# Altium PCB SiPAP_PCB.PcbDoc
Units mil, origin at the board's own origin, x right, y up, seen from the top; angles counter-clockwise.
Board outline 4000 x 3000 mil, 2 copper layers (Top Layer, Bottom Layer); 78 components, 40 nets, 273 pads, 139 vias.
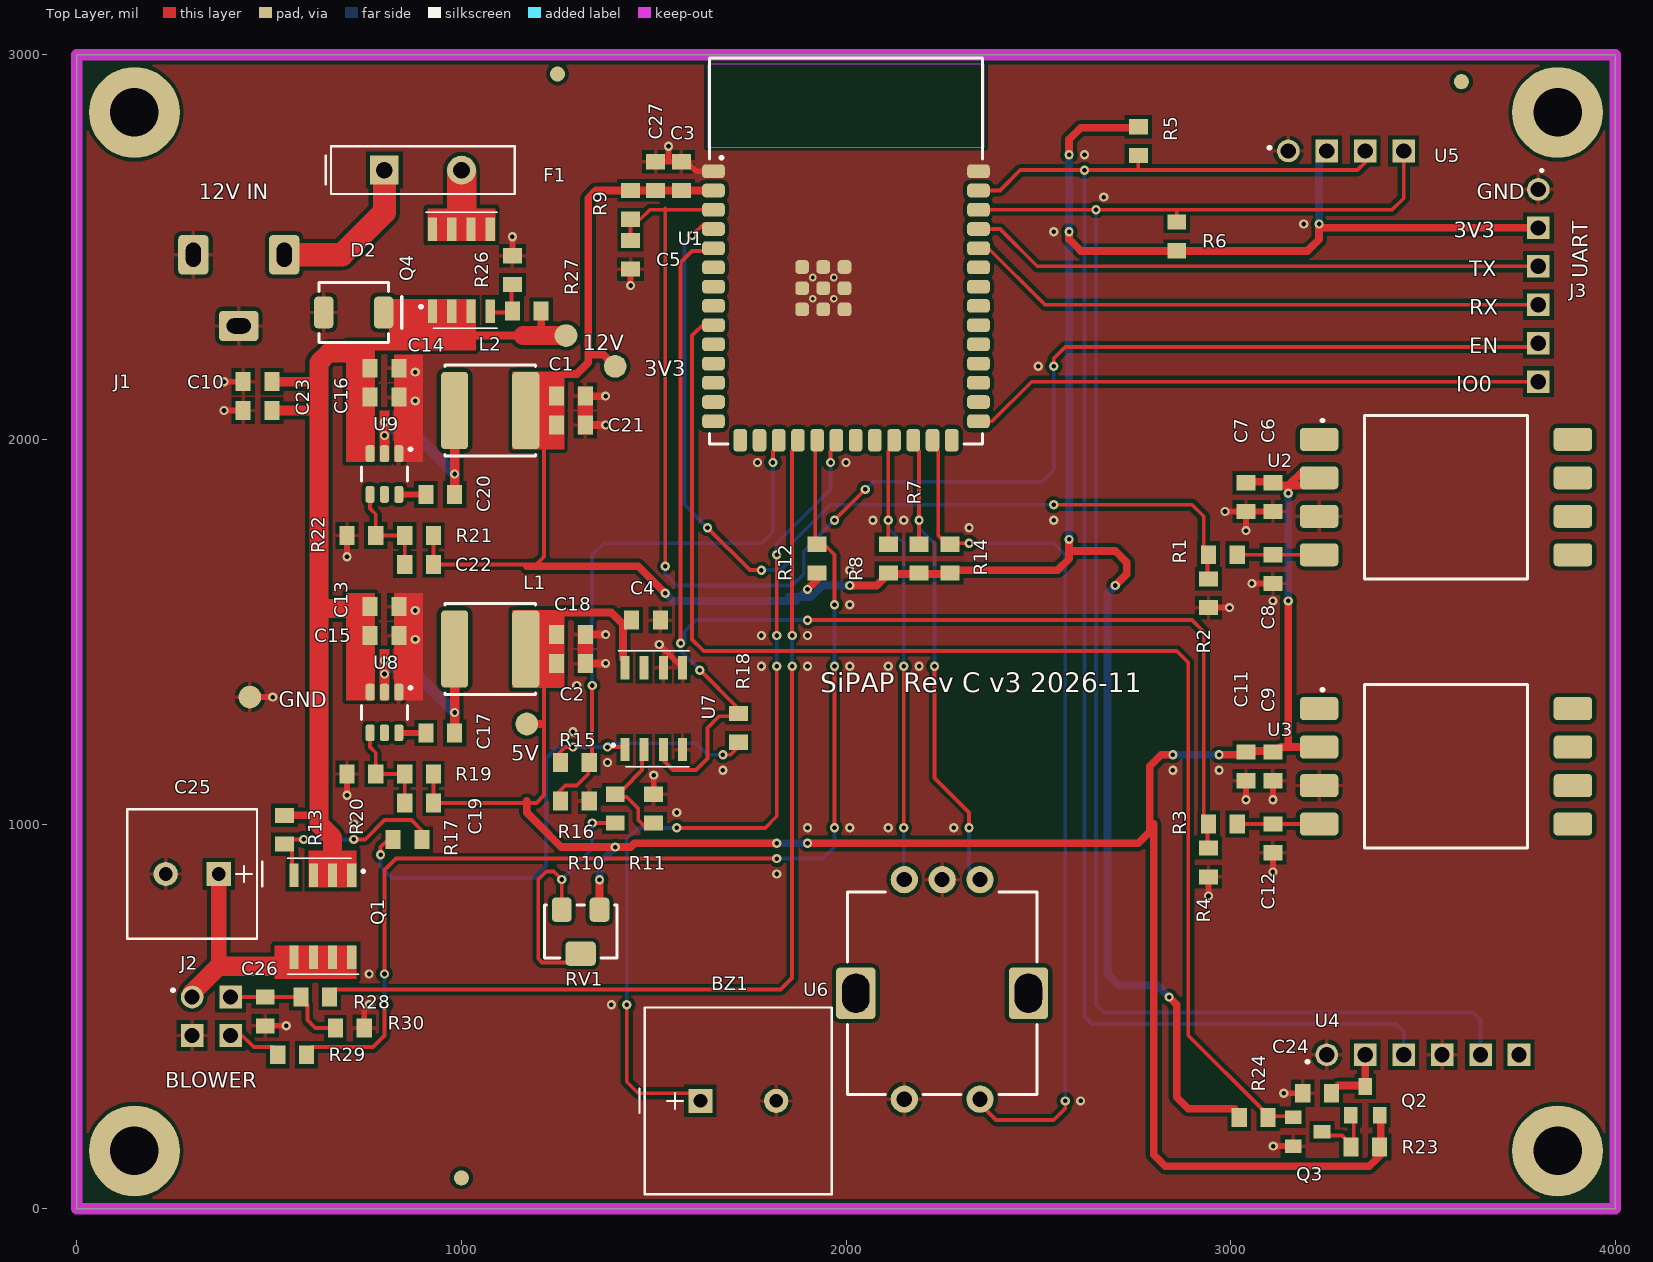
[diagram p0: Top Layer view]
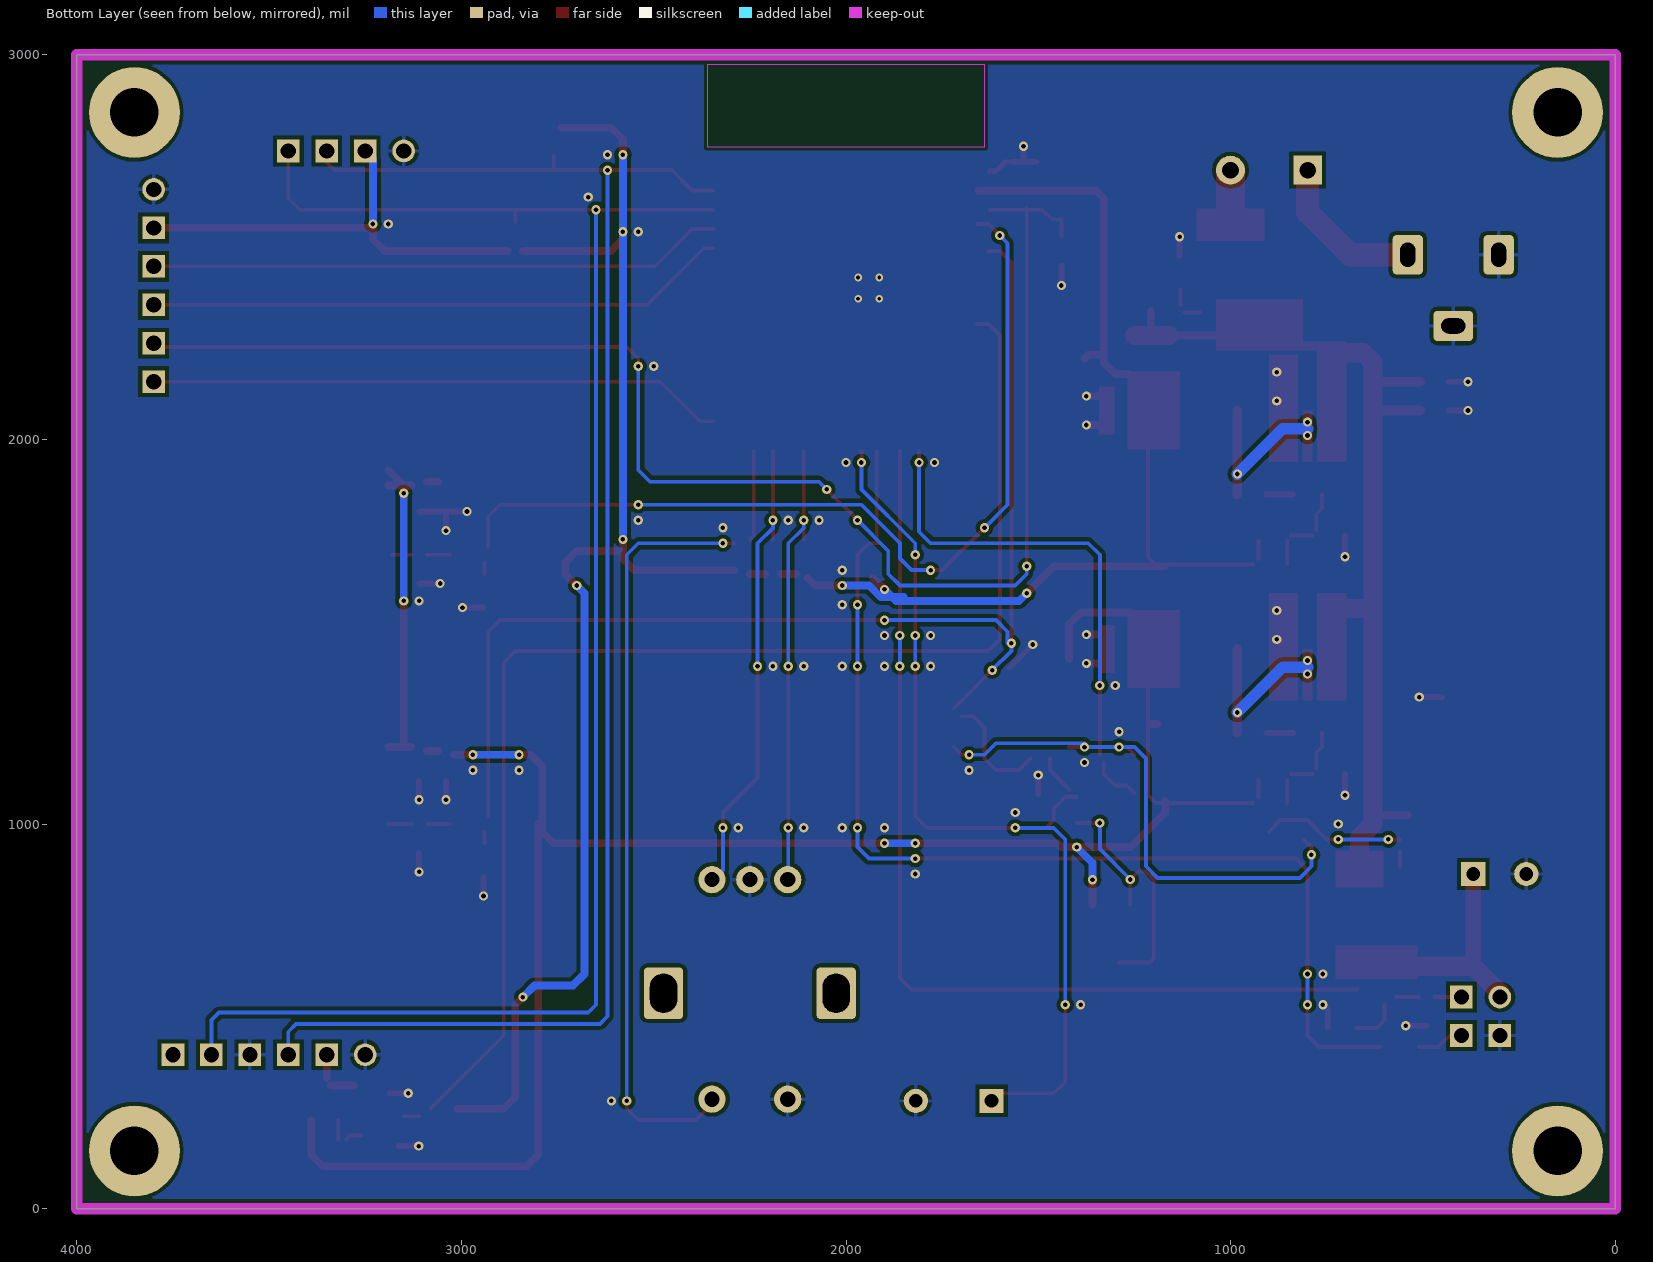
[diagram p1: Bottom Layer view, seen from below]

## Layer stack, top to bottom
Top Solder: solder mask 0.4, Solder Resist, Dk 3.5
Top Layer: signal copper 1.4
Dielectric 1: dielectric 12.6, FR-4, Dk 4.8
Bottom Layer: signal copper 1.4
Bottom Solder: solder mask 0.4, Solder Resist, Dk 3.5

## Board outline
0,0 4000,0 4000,3000 0,3000

## Design rules (kind name [scope] priority, off if disabled: settings)
Clearance [All] p1: gap=10 ignorepadtopadclearanceinfootprint=FALSE
Height [All] p1: minheight=0 maxheight=1250 prefheight=500
HoleSize [All] p1: absolutevalues=TRUE maxlimit=150 minlimit=1 maxpercent=80.000 minpercent=20.000
MinimumSolderMaskSliver [All] p1: minsoldermaskwidth=4 // JLCPCB soldermask bridge 0.10 mm (1 oz, green)
PolygonConnect PolyConnect_U1_EPAD_Direct [InComponent('U1')] p1: connectstyle=Direct reliefconductorwidth=10 reliefentries=4 polygonreliefangle="90 Angle" airgapwidth=10
PolygonConnect PolyConnect_Vias_Direct [IsVia] p2: connectstyle=Direct reliefconductorwidth=10 reliefentries=4 polygonreliefangle="90 Angle" airgapwidth=10
PolygonConnect [All] p3: connectstyle=Relief reliefconductorwidth=10 reliefentries=4 polygonreliefangle="90 Angle" airgapwidth=10
RoutingCorners [All] p1: cornerstyle=45-Degree minsetback=10 maxsetback=100
RoutingVias [All] p1: holewidth=12 width=24 viastyle="Through Hole" minholewidth=10 minwidth=20 maxholewidth=16 maxwidth=32
SilkToSilkClearance [All] p1: silktosilkclearance=6 // JLCPCB silk spacing 0.15 mm
SilkToSolderMaskClearance [IsPad] p1: minsilkscreentomaskgap=6 clearancetoexposedcopper=TRUE // JLCPCB: silkscreen to pad >= 0.15 mm
SolderMaskExpansion TentedVias [IsVia] p1: expansion=-30 istentingtop=FALSE
SolderMaskExpansion [All] p2: expansion=0 istentingtop=FALSE
SupplyNets "Schematic Supply Nets_3" [InNet('3V3')] p1: voltage=0.000
SupplyNets "Schematic Supply Nets_2" [InNet('GND')] p2: voltage=0.000
SupplyNets "Schematic Supply Nets_1" [InNet('VIN12V')] p3: voltage=0.000
SupplyNets "Schematic Supply Nets" [InNet('5V')] p4: voltage=0.000
ViasUnderSMD NoViaInPad [All] p1: allowed=FALSE
Width [Not (InNet('VIN12V') Or InNet('VIN_RAW') Or InNet('VIN_FUSED') Or InNet('BLOWER_V12') Or InNet('5V') Or InNet('3V3') Or InNet('GND') Or InNet('SW5') Or InNet('SW3'))] p1: maxlimit=25 minlimit=10 preferedwidth=10 // signals 10 mil; BST 15; SFM_5V 20
Width Width_Power12V [InNet('VIN12V') Or InNet('VIN_RAW') Or InNet('VIN_FUSED') Or InNet('BLOWER_V12')] p2: maxlimit=80 minlimit=20 preferedwidth=50 // 12 V path 50-60 mil + copper regions on MOSFET pins
Width Width_Rails [InNet('5V') Or InNet('3V3') Or InNet('GND') Or InNet('SW5') Or InNet('SW3')] p3: maxlimit=60 minlimit=10 preferedwidth=20 // 5V/3V3 rails 20 mil (FB Kelvin sense 10 mil); GND stubs 15-20; SW node 25-30 (TI SLVSD26C 7.4.1: SW short and wide)
24 further rules are at their usual default settings.

## Components (designator, comment, footprint, x,y, rotation, side; value= is the part's Value field where it differs from the comment)
BZ1 "PS1240P02BT" BUZZER_TDK_PS1240 1720,280 r0 top
C1 "22uF 16V" R_0805 1285,2112.5 r0 top
C2 "22uF 16V" R_0805 1285,1417.5 r0 top
C3 "100nF" R_0805 1572,2684.5 r90 top
C4 "100nF" R_0805 1480,1530 r0 top
C5 "1uF" R_0805 1440,2480 r270 top
C6 "1uF" R_0805 3110,1850 r270 top
C7 "10nF" R_0805 3040,1850 r270 top
C8 "470pF" R_0805 3110,1662.6 r270 top
C9 "1uF" R_0805 3110,1150 r270 top
C10 "10uF 35V" R_0805 470,2150 r180 top
C11 "10nF" R_0805 3040,1150 r270 top
C12 "470pF" R_0805 3110,962.6 r270 top
C13 "10uF 35V" R_0805 800,1565 r0 top
C14 "10uF 35V" R_0805 800,2185 r0 top
C15 "100nF" R_0805 800,1490 r0 top
C16 "100nF" R_0805 800,2110 r0 top
C17 "100nF" R_0805 945,1236.85 r0 top
C18 "22uF 16V" R_0805 1285,1492.5 r0 top
C19 "75pF C0G" R_0805 890,1055 r180 top
C20 "100nF" R_0805 945,1856.85 r0 top
C21 "22uF 16V" R_0805 1285,2037.5 r0 top
C22 "56pF C0G" R_0805 890,1675 r180 top
C23 "22uF 25V" R_0805 470,2075 r180 top
C24 "100nF" R_0805 3225,300 r180 top
C25 "220uF 25V" CAP_RAD_D8_P3.5 300,870 r180 top
C26 "1uF" R_0805 490,512.6 r270 top
C27 "22uF 16V" R_0805 1505,2684.5 r90 top
D2 "SMBJ13A TVS" DIOM_SMB_DO-214AA_BOURNS 720,2330 r180 top
F1 "MF-R400 4A PTC" PTC_RADIAL_MF-R300 900,2700 r0 top
J1 "PJ-102AH 12V IN" CUI_PJ-102AH 0,2480 r0 top
J2 "Blower cable" CONN_HEADER_4_2X2 300,450 r0 top
J3 "Prog UART" CONN_HEADER_6 3800,2650 r270 top
L1 "15uH SRN6045TA-150M" IND_BOURNS_SRN6045TA 1074.9,1455 r90 top
L2 "10uH SRN6045TA-100M" IND_BOURNS_SRN6045TA 1074.9,2075 r90 top
Q1 "AO4407A" SOIC-8 640,760 r270 top
Q2 "AO3401A" SOT-23 3350,280 r0 top
Q3 "2N7002" SOT-23 3200,200 r270 top
Q4 "AO4407A" SOIC-8 1000,2440 r90 top
R1 "10k" R_0805 2980,1700 r180 top
R2 "20k" R_0805 2942.6,1600 r270 top
R3 "10k" R_0805 2980,1000 r180 top
R4 "20k" R_0805 2942.6,900 r270 top
R5 "4.7k" R_0805 2760,2775.4 r270 top
R6 "4.7k" R_0805 2860,2528 r90 top
R7 "10k" R_0805 2190,1690 r90 top
R8 "10k" R_0805 2110,1690 r90 top
R9 "10k" R_0805 1440,2609.7 r270 top
R10 "36k" R_0805 1400,1040 r90 top
R11 "10k" R_0805 1500,1040 r90 top
R12 "10k" R_0805 1925,1690 r90 top
R13 "10k" R_0805 540,985 r90 top
R14 "10k" R_0805 2270,1690 r90 top
R15 "1M" R_0805 1295,1160 r0 top
R16 "330k" R_0805 1295,1060 r0 top
R17 "10k" R_0805 860,960 r180 top
R18 "1M" R_0805 1720,1250 r90 top
R19 "100k 0.1%" R_0805 890,1130 r180 top
R20 "13.3k 0.1%" R_0805 740,1130 r180 top
R21 "100k 1%" R_0805 890,1750 r180 top
R22 "22.1k 1%" R_0805 740,1750 r180 top
R23 "100k" R_0805 3350,160 r180 top
R24 "10k" R_0805 3060,237.4 r0 top
R26 "10k" R_0805 1132.6,2440 r90 top
R27 "10k" R_0805 1170,2333.7 r0 top
R28 "1k" R_0805 620,550 r180 top
R29 "1k" R_0805 560,400 r0 top
R30 "100k" R_0805 710,470 r0 top
RV1 "50k" BOURNS_3224W 1310,720 r90 top
U1 "ESP32-S3-WROOM-1-N8R8" ESP32-S3-WROOM-1_DS 2000,2490 r0 top
U2 "MPXV5010GC6U (primary)" MPXV5010GC6U_482A 3560,1850 r180 top
U3 "MPXV5010GC6U (redundant)" MPXV5010GC6U_482A 3560,1150 r180 top
U4 "SFM3300-D" CONN_HEADER_6 3250,400 r0 top
U5 "OLED 0.96in I2C" CONN_HEADER_4 3150,2750 r0 top
U6 "PEC11R-4225F-S0024" PEC11R-4xxxF-S_DS 2250,560 r180 top
U7 "LM393" SOIC-8 1500,1300 r90 top
U8 "TPS54202 (5V)" TI_DDC0006A_SOT23-6 800,1290 r270 top
U9 "TPS54202 (3V3)" TI_DDC0006A_SOT23-6 800,1910 r270 top

## Footprints (in the part's own frame and the unit in brackets; to place one, negate y for a bottom-side part, rotate by r counter-clockwise, add the part's x,y. Pads: shape width x height; smd on the part's side, far side on the other; paste and mask are expansions set on the pad)
BOURNS_3224W [mm] "Custom, 3 pads; custom lands, density N (nominal); from Bourns 3224 4 mm SMD Trimpot Trimming Potentiometer, 3224W Top Adjust: recommended land pattern; top view pins 1/3 one side, 2 opposite (shown rotated 180 deg), p. 1; Bourns 3224W-1 4 mm SMD multiturn trimmer, top adjust. Land pattern and pin numbers per Bourns 3224 datasheet p.1 (1 = CCW, 2 = wiper, 3 = CW)."
  rrect38% 1.6x1.3 smd: 1(1.45,-1.25) 3(1.45,1.25)
  rrect31% 1.6x2 smd: 2(-1.45,0)
  silkscreen extent -1.75,-2.4 1.75,2.4, body extent -2.25,-2.4 2.25,2.4, height 5.3
BUZZER_TDK_PS1240 [mil] "TDK PS1240P02BT piezo buzzer (TDK PS series p2-3: dia 12.2, H 6.5, pitch 5.0, pin 0.65). Hole 0.9 mm."
  rect 63x63 hole 35.4: 1(-98.42,0)
  round 63 hole 35.4: 2(98.42,0)
  silkscreen extent -257,-243 243,243, body extent -240,-240 240,240, height 256
CAP_RAD_D8_P3.5 [mil] "Radial aluminium electrolytic D8 mm, lead pitch 3.5 mm, lead 0.6 mm (Panasonic EEU-FC1E221, FC-A series p6). Pad 1 (square) = +. Hole 0.9 mm."
  rect 63x63 hole 35.4: 1(-68.9,0)
  round 63 hole 35.4: 2(68.9,0)
  silkscreen extent -182,-169 169,169, body extent -157,-157 157,157, height 453
CONN_HEADER_4 [mm] "4-pin THT header, single row, 2.54mm pitch (OLED / buck module)"
  round 1.5 hole 1: 1(0,0)
  rect 1.5x1.5 hole 1: 2(2.54,0) 3(5.08,0) 4(7.62,0)
  body extent -1.27,-1.27 8.89,1.27, height 8.5
CONN_HEADER_4_2X2 [mm] "4-pin THT header, 2x2, 2.54mm pitch (blower cable connector)"
  round 1.5 hole 1: 1(0,2.54)
  rect 1.5x1.5 hole 1: 2(0,0) 3(2.54,2.54) 4(2.54,0)
  body extent -1.27,-1.27 3.81,3.81, height 8.5
CONN_HEADER_6 [mm] "6-pin THT header 2.54mm pitch, single row (for SFM3300-D cable connector)"
  round 1.5 hole 1: 1(0,0)
  rect 1.5x1.5 hole 1: 2(2.54,0) 3(5.08,0) 4(7.62,0) 5(10.16,0) 6(12.7,0)
  body extent -1.27,-1.27 13.97,1.27, height 8.5
CUI_PJ-102AH [mm] "Custom, 3 pads; custom lands, density N (nominal); from Same Sky PJ-102AH datasheet (09/12/2024), Recommended PCB Layout Top View, p. 2; Same Sky PJ-102AH DC jack, 2.0 mm pin, 5 A. Layout p2. Origin = plug-entry face on jack axis (place at board edge). Pin1 centre (+), pin2 sleeve, pin3 switch. Slots 1.0x1.6."
  rrect25% 2x2.6 hole 1 slot 1.6 at 90 deg: 1(13.7,0) 2(7.7,0)
  rrect25% 2.6x2 hole 1 slot 1.6 at 0 deg: 3(10.7,-4.7)
  Keep-Out Layer lines w0.762: 0,-5.08 0,5.08
  body extent 0,-4.5 14.4,4.5, height 11
DIOM_SMB_DO-214AA_BOURNS [mm] "Custom, 2 pads; custom lands, density N (nominal); from Bourns SMBJ Series TVS datasheet, Recommended Footprint SMB (DO-214AA), p. 3; Bourns SMB (DO-214AA) recommended footprint p3. Pad1 = cathode (band), pad2 = anode."
  rrect39% 1.27x2.1 smd: 1(-1.98,0) 2(1.98,0)
  silkscreen extent -2.28,-1.97 2.28,1.97, body extent -2.3,-1.95 2.3,1.95, height 2.44
ESP32-S3-WROOM-1_DS [mm] "Custom, 41 pads; custom lands, density N (nominal); from ESP32-S3-WROOM-1 & WROOM-1U Datasheet, v1.8, Figure 11-1 Recommended PCB Land Pattern, p. 45; Espressif datasheet v1.8 Fig 11-1. Origin = module centre. Antenna area = top 6 mm: keep copper out."
  rrect50% 1.5x0.9 smd: 1(-8.75,5.26) 2(-8.75,3.99) 3(-8.75,2.72) 4(-8.75,1.45) 5(-8.75,0.18) 6(-8.75,-1.09) 7(-8.75,-2.36) 8(-8.75,-3.63) 9(-8.75,-4.9) 10(-8.75,-6.17) 11(-8.75,-7.44) 12(-8.75,-8.71) 13(-8.75,-9.98) 14(-8.75,-11.25) 27(8.75,-11.25) 28(8.75,-9.98) 29(8.75,-8.71) 30(8.75,-7.44) 31(8.75,-6.17) 32(8.75,-4.9) 33(8.75,-3.63) 34(8.75,-2.36) 35(8.75,-1.09) 36(8.75,0.18) 37(8.75,1.45) 38(8.75,2.72) 39(8.75,3.99) 40(8.75,5.26)
  rrect50% 0.9x1.5 smd: 15(-6.985,-12.5) 16(-5.715,-12.5) 17(-4.445,-12.5) 18(-3.175,-12.5) 19(-1.905,-12.5) 20(-0.635,-12.5) 21(0.635,-12.5) 22(1.905,-12.5) 23(3.175,-12.5) 24(4.445,-12.5) 25(5.715,-12.5) 26(6.985,-12.5)
  rrect50% 0.9x0.9 smd: 41(-2.9,-3.86) 41(-2.9,-2.46) 41(-2.9,-1.06) 41(-1.5,-3.86) 41(-1.5,-2.46) 41(-1.5,-1.06) 41(-0.1,-3.86) 41(-0.1,-2.46) 41(-0.1,-1.06)
  Keep-Out Layer region: -9.144,6.858 9.144,6.858 9.144,12.319 -9.144,12.319
  Keep-Out Layer lines w0.762: -9.652,12.954 9.652,12.954
  silkscreen extent -9,-12.75 9,12.75, body extent -9,-12.75 9,12.75, height 3.1
IND_BOURNS_SRN6045TA [mm] "Custom, 2 pads; custom lands, density N (nominal); from Bourns SRN6045TA Series datasheet, Recommended Layout, p. 1; Bourns SRN6045TA power inductor, recommended layout p1 (6.0x6.0 body, 4.25+/-0.3 tall)."
  rrect28% 5.1x1.8 smd: 1(0,2.35) 2(0,-2.35)
  silkscreen extent -3,-3 3,3, body extent -3,-3 3,3, height 4.55
MPXV5010GC6U_482A [mm] "Custom, 8 pads; custom lands, density N (nominal); from Motorola MPX5010/MPXV5010G Series datasheet (MPX5010/D), 2001, Figure 5 SOP Footprint (Case 482), p. 6; Case 482A land pattern per datasheet Fig 5 p6; pin order per Case 482A top view p7. Height 13.21 max incl. port."
  rrect33% 2.54x1.52 smd: 1(8.38,-3.81) 2(8.38,-1.27) 3(8.38,1.27) 4(8.38,3.81) 5(-8.38,3.81) 6(-8.38,1.27) 7(-8.38,-1.27) 8(-8.38,-3.81)
  silkscreen extent -5.4,-5.4 5.4,5.4, body extent -9.21,-5.4 9.21,5.4, height 13.21
PEC11R-4xxxF-S_DS [mm] "Custom, 6 pads; custom lands, density N (nominal); from Bourns PEC11R Series 12 mm Incremental Encoder datasheet, PEC11R-4xxxF-Sxxxx recommended PCB layout, p. 2; Bourns PEC11R-4xxxF-Sxxxx PCB layout (datasheet p2). Origin = shaft centre. A-C-B 2.5mm pitch 7.5mm below, switch pins 7.0mm above, 2 plated mounting slots 1.8x2.6 (13.2 outer), pad MP = mechanical."
  round 1.8 hole 1: 1(-2.5,-7.5) 2(2.5,-7.5) 3(0,-7.5) 4(-2.5,7) 5(2.5,7)
  rrect19% 2.6x3.4 hole 1.8 slot 2.6 at 90 deg: MP(-5.7,0) MP(5.7,0)
  silkscreen extent -6.25,-6.7 6.25,6.7, body extent -6.25,-6.7 6.25,6.7, height 31.5
PTC_RADIAL_MF-R300 [mil] "Bourns MF-R300 radial PPTC (datasheet p3: A 12.0 max, B 18.3 max tall, C 5.1 lead spacing, E 3.0 max, lead dia 0.81). Hole 1.1 mm."
  rect 75x75 hole 43.3: 1(-100.39,0)
  round 75 hole 43.3: 2(100.39,0)
  silkscreen extent -253,-62 239,62, body extent -283,-59 283,59, height 976
R_0805 [mm] "Standard 0805 SMD chip resistor land pattern (IPC nominal)"
  rect 1x1.25 smd: 1(-0.95,0) 2(0.95,0)
  body extent -1,-0.63 1,0.63, height 1.25
SOIC-8 [mm] "Standard SOIC-8, 1.27mm pitch, 3.9mm body (LM393 comparator)"
  rect 1.55x0.6 smd: 1(-2.7,1.905) 2(-2.7,0.635) 3(-2.7,-0.635) 4(-2.7,-1.905) 5(2.7,-1.905) 6(2.7,-0.635) 7(2.7,0.635) 8(2.7,1.905)
  silkscreen extent -3.83,-2.35 3.83,2.35, body extent -3,-2.45 3,2.45, height 1.75
SOT-23 [mm] "Standard SOT-23-3, 0.95mm pitch (AO3401A P-MOSFET, pin1=G pin2=S pin3=D)"
  rect 0.9x1.1 smd: 1(-0.95,-0.95) 2(0.95,-0.95) 3(0,0.95)
  body extent -1.45,-0.65 1.45,0.65, height 1.12
TI_DDC0006A_SOT23-6 [mm] "Custom, 6 pads; custom lands, density N (nominal); from TI TPS54202 datasheet SLVSD26C, C (Feb 2026), DDC0006A Example Board Layout, p. 29; TI DDC0006A (SOT-23-6, 1.1 max height) land pattern per TPS54202 datasheet p29."
  rrect50% 1.1x0.6 smd: 1(-1.35,0.95) 2(-1.35,0) 3(-1.35,-0.95) 4(1.35,-0.95) 5(1.35,0) 6(1.35,0.95)
  silkscreen extent -0.45,-1.53 0.45,1.53, body extent -0.8,-1.45 0.8,1.45, height 1.1

## Part data
BZ1: library part BUZZER, "Generic piezo buzzer, 2-pin", Manufacturer=TDK, Manufacturer 1=TDK, Manufacturer Part Number=PS1240P02BT, Manufacturer Part Number 1=PS1240P02BT
C1 C2 C18 C21: library part CAPACITOR, "Generic capacitor, 2-pin", Manufacturer=Murata, Manufacturer Part Number=GRM21BR61C226ME44, Manufacturer 1=Murata, Manufacturer Part Number 1=GRM21BR61C226ME44
C3 C4 C15 C16 C17 C20 C24: library part CAPACITOR, "Generic capacitor, 2-pin", Manufacturer=Samsung, Manufacturer Part Number=CL21B104KBCNNNC, Manufacturer 1=Samsung, Manufacturer Part Number 1=CL21B104KBCNNNC
C5 C6 C9 C26: library part CAPACITOR, "Generic capacitor, 2-pin", Manufacturer=Samsung, Manufacturer Part Number=CL21B105KAFNNNE, Manufacturer 1=Samsung, Manufacturer Part Number 1=CL21B105KAFNNNE
C7 C11: library part CAPACITOR, "Generic capacitor, 2-pin", Manufacturer=Samsung, Manufacturer Part Number=CL21B103KBANNNC, Manufacturer 1=Samsung, Manufacturer Part Number 1=CL21B103KBANNNC
C8 C12: library part CAPACITOR, "Generic capacitor, 2-pin", Manufacturer=Samsung, Manufacturer Part Number=CL21C471JBANNNC, Manufacturer 1=Samsung, Manufacturer Part Number 1=CL21C471JBANNNC
C10 C13 C14: library part CAPACITOR, "Generic capacitor, 2-pin", Manufacturer=Murata, Manufacturer Part Number=GRM21BR6YA106KE43, Manufacturer 1=Murata, Manufacturer Part Number 1=GRM21BR6YA106KE43
C19: library part CAPACITOR, "Generic capacitor, 2-pin", Manufacturer=Murata, Manufacturer Part Number=GRM2165C1H750JA01, Manufacturer 1=Murata, Manufacturer Part Number 1=GRM2165C1H750JA01
C22: library part CAPACITOR, "Generic capacitor, 2-pin", Manufacturer=Murata, Manufacturer Part Number=GRM2165C1H560JA01, Manufacturer 1=Murata, Manufacturer Part Number 1=GRM2165C1H560JA01
C23: library part CAPACITOR, "Generic capacitor, 2-pin", Manufacturer=Murata, Manufacturer Part Number=GRM21BR61E226ME44, Manufacturer 1=Murata, Manufacturer Part Number 1=GRM21BR61E226ME44
C25: library part CAP_POL, "Polarized capacitor (aluminium electrolytic), pin 1 = +", Manufacturer=Panasonic, Manufacturer Part Number=EEU-FC1E221, Manufacturer 1=Panasonic, Manufacturer Part Number 1=EEU-FC1E221
C27: library part CAPACITOR, "MLCC 22uF X5R 16V 0805 - U1 3V3 bulk (Espressif WROOM-1 DS v1.8 Fig 9-1 C1)", Manufacturer=Murata, Manufacturer Part Number=GRM21BR61C226ME44, Manufacturer 1=Murata, Manufacturer Part Number 1=GRM21BR61C226ME44
D2: library part TVS_UNI, "Unidirectional TVS (Bourns SMBJ13A, VRWM 13V, Vc 21.5V@10/1000us, 28.0V@8/20us), pin1 = cathode", Manufacturer=Bourns, Manufacturer Part Number=SMBJ13A, Manufacturer 1=Bourns, Manufacturer Part Number 1=SMBJ13A
F1: library part FUSE_PTC, "Resettable PTC fuse (Bourns MF-R300)", Manufacturer=Bourns, Manufacturer Part Number=MF-R400, Manufacturer 1=Bourns, Manufacturer Part Number 1=MF-R400
J1: library part CONN_DCJACK3, "DC power jack 3-pin (Same Sky PJ-102AH): 1 centre pin (+), 2 sleeve, 3 switch", Manufacturer="Same Sky", Manufacturer Part Number=PJ-102AH, Manufacturer 1="Same Sky", Manufacturer Part Number 1=PJ-102AH
J2: library part CONN_BLOWER4, "4-pin blower cable connector: 12V, GND, PWM, FG", Manufacturer="Wurth Elektronik", Manufacturer Part Number=61300421121, Manufacturer 1="Wurth Elektronik", Manufacturer Part Number 1=61300421121
J3: library part CONN_UART6, "6-pin 2.54mm programming header (USB-UART): GND 3V3 TXD RXD EN IO0", Manufacturer="Wurth Elektronik", Manufacturer Part Number=61300611121, Manufacturer 1="Wurth Elektronik", Manufacturer Part Number 1=61300611121
L1: library part INDUCTOR, "Power inductor (Bourns SRN6045TA)", Manufacturer=Bourns, Manufacturer Part Number=SRN6045TA-150M, Manufacturer 1=Bourns, Manufacturer Part Number 1=SRN6045TA-150M
L2: library part INDUCTOR, "Power inductor (Bourns SRN6045TA)", Manufacturer=Bourns, Manufacturer Part Number=SRN6045TA-100M, Manufacturer 1=Bourns, Manufacturer Part Number 1=SRN6045TA-100M
Q1 Q4: "AOS AO4407A P-channel MOSFET -30V -12A, SOIC-8 (S=1,2,3 G=4 D=5-8, datasheet Rev 11.1 p1 top view)", Manufacturer="Alpha & Omega Semiconductor", Manufacturer 1="Alpha & Omega Semiconductor", Manufacturer Part Number=AO4407A, Manufacturer Part Number 1=AO4407A
Q2: "Alpha&Omega AO3401A P-channel MOSFET, SOT-23 (AOS datasheet)", Manufacturer="Alpha & Omega Semiconductor", Manufacturer 1="Alpha & Omega Semiconductor", Manufacturer Part Number=AO3401A, Manufacturer Part Number 1=AO3401A
Q3: "N-channel MOSFET 60V 0.2A SOT-23 (Diodes 2N7002 DS11303 p1: 1=G 2=S 3=D)", Manufacturer="Diodes Incorporated", Manufacturer Part Number=2N7002-7-F, Manufacturer 1="Diodes Incorporated", Manufacturer Part Number 1=2N7002-7-F
R1 R3 R7 R8 R9 R11 R12 R13 R14 R17 R24 R26 R27: library part RESISTOR, "Generic resistor, 2-pin", Manufacturer=Yageo, Manufacturer Part Number=RC0805FR-0710KL, Manufacturer 1=Yageo, Manufacturer Part Number 1=RC0805FR-0710KL
R2 R4: library part RESISTOR, "Generic resistor, 2-pin", Manufacturer=Yageo, Manufacturer Part Number=RC0805FR-0720KL, Manufacturer 1=Yageo, Manufacturer Part Number 1=RC0805FR-0720KL
R5 R6: library part RESISTOR, "Generic resistor, 2-pin", Manufacturer=Yageo, Manufacturer Part Number=RC0805FR-074K7L, Manufacturer 1=Yageo, Manufacturer Part Number 1=RC0805FR-074K7L
R10: library part RESISTOR, "Generic resistor, 2-pin", Manufacturer=Yageo, Manufacturer Part Number=RC0805FR-0747KL, Manufacturer 1=Yageo, Manufacturer Part Number 1=RC0805FR-0747KL
R15 R18: library part RESISTOR, "Generic resistor, 2-pin", Manufacturer=Yageo, Manufacturer Part Number=RC0805FR-071ML, Manufacturer 1=Yageo, Manufacturer Part Number 1=RC0805FR-071ML
R16: library part RESISTOR, "Generic resistor, 2-pin", Manufacturer=Yageo, Manufacturer Part Number=RC0805FR-07330KL, Manufacturer 1=Yageo, Manufacturer Part Number 1=RC0805FR-07330KL
R19 R21 R23: library part RESISTOR, "Generic resistor, 2-pin", Manufacturer=Yageo, Manufacturer Part Number=RC0805FR-07100KL, Manufacturer 1=Yageo, Manufacturer Part Number 1=RC0805FR-07100KL
R20: library part RESISTOR, "Generic resistor, 2-pin", Manufacturer=Yageo, Manufacturer Part Number=RC0805FR-0713K3L, Manufacturer 1=Yageo, Manufacturer Part Number 1=RC0805FR-0713K3L
R22: library part RESISTOR, "Generic resistor, 2-pin", Manufacturer=Yageo, Manufacturer Part Number=RC0805FR-0722K1L, Manufacturer 1=Yageo, Manufacturer Part Number 1=RC0805FR-0722K1L
R28 R29: library part RESISTOR, "Generic resistor, 2-pin", Manufacturer=Yageo, Manufacturer Part Number=RC0805FR-071KL, Manufacturer 1=Yageo, Manufacturer Part Number 1=RC0805FR-071KL
R30: library part RESISTOR, "Generic resistor, 2-pin"
RV1: library part TRIMPOT_3224W
U1: library part ESP32-S3-WROOM-1, "Espressif ESP32-S3-WROOM-1 WiFi+BLE module, 41 pins (datasheet v1.8)", Manufacturer=Espressif, Manufacturer 1=Espressif, Manufacturer Part Number=ESP32-S3-WROOM-1-N8R8, Manufacturer Part Number 1=ESP32-S3-WROOM-1-N8R8
U2 U3: library part MPXV5010GC6U, "NXP/Motorola MPXV5010GC6U pressure sensor, SOP-8 (Case 482A), 0-10kPa analog output", Manufacturer=NXP, Manufacturer 1=NXP, Manufacturer Part Number=MPXV5010GC6U, Manufacturer Part Number 1=MPXV5010GC6U
U4: "Sensirion SFM3300-D digital flow meter, I2C addr 0x40, 6-pad connector (Datasheet D1 v1.4)", Manufacturer="Wurth Elektronik", Manufacturer Part Number=61300611121, Manufacturer 1="Wurth Elektronik", Manufacturer Part Number 1=61300611121
U5: library part SSD1306_OLED_I2C, "0.96in 128x64 I2C OLED module, 4-pin (GND,VCC,SCL,SDA), addr 0x3C", Manufacturer="Wurth Elektronik", Manufacturer Part Number=61300411121, Manufacturer 1="Wurth Elektronik", Manufacturer Part Number 1=61300411121
U6: library part PEC11R-4220F-S0024, "Bourns PEC11R rotary encoder w/ push switch, 5 terminals (Bourns datasheet Rev 04/26)", Manufacturer=Bourns, Manufacturer 1=Bourns, Manufacturer Part Number=PEC11R-4225F-S0024, Manufacturer Part Number 1=PEC11R-4225F-S0024
U7: "Dual comparator, DIP-8/SOIC-8 (TI datasheet SLCS006)", Manufacturer="Texas Instruments", Manufacturer Part Number=LM393DR, Manufacturer 1="Texas Instruments", Manufacturer Part Number 1=LM393DR
U8 U9: library part TPS54202, "TI TPS54202 4.5-28V 2A synchronous buck, SOT-23-6 (DDC)", Manufacturer="Texas Instruments", Manufacturer Part Number=TPS54202DDCR, Manufacturer 1="Texas Instruments", Manufacturer Part Number 1=TPS54202DDCR

## Free pads (board coordinates)
  round 39.37 smd paste-25 mask+19.69: FID1(1250,2950) FID2(3600,2930) FID3(1000,80)
  round 236 hole 126: MH1(150,150) MH2(3850,150) MH3(150,2850) MH4(3850,2850)
  round 59 smd paste-40: TP1(1272,2270) TP2(1170,1260) TP3(1400,2190) TP4(450,1330)

## Via types
v1: diameter 24, hole 12, Top Layer to Bottom Layer, 131 vias
v2: diameter 24, hole 12, Top Layer to Bottom Layer, tented both sides, 4 vias
v3: diameter 20, hole 10, Top Layer to Bottom Layer, 4 vias

## Nets (pads, with @x,y where several pads share a name; then routed paths per layer and width w, separated by ;. In a path a pad name is that pad's centre, name@x,y a point inside that pad or via, vN(x,y) a via of type N, cw(c..) or ccw(c..) an arc to the next point about the centre after c; other vN are vias at no path point)
3V3: C1.1 C3.1 C21.1 C22.1 C27.1 J3.2 L2.2 pad.TP3 R5.1 R6.1 R7.1 R8.1 R9.1 R12.1 R14.1 R21.1 R24.1 U1.2 U5.2 | length 7490.1
  Top Layer w10: C22.1@927.4,1689 R21.1@927.4,1736 ; C22.1@941.4,1675 1195,1675 1215,1695 1215,1974.5
  Top Layer w20: 1170,1670 1460,1670 v1(1530,1600) ; 1267,2170 1300,2170 1330,2200 1330,2627.1 1350,2647.1 R9.1 C27.1 C3.1 U1.2 ; 1340,2220 1370,2220 pad.TP3@1380,2210 ; v1(1900,1610) R12.1@1930,1640 ; v1(2010,1620) 2080,1620 R8.1@2100,1640 ; R8.1@2130,1650 R7.1@2170,1650 ; R7.1@2210,1650 R14.1@2250,1650 ; R14.1@2290,1660 2550,1660 2580,1690 v1(2580,1740) ; v1(2580,2540) 2580,2520 2610,2490 R6.1@2840,2490 ; v1(2580,2740) 2580,2780 2610,2810 R5.1@2740,2810 ; 2590,1710 2700,1710 2730,1680 2730,1650 v1(2700,1620) ; v1(2840,550) 2860,530 2860,290 2890,260 R24.1@3010,260 ; R6.1@2880,2490 3200,2490 3230,2520 v1(3230,2560) ; 3240,2550 J3.2@3780,2550
  Bottom Layer w20: v1(1530,1600) 1550,1580 1870,1580 v1(1900,1610) ; 1850,1590 1910,1590 1940,1620 v1(2010,1620) ; v1(2580,1740) v1(2580,2740) ; v1(2700,1620) 2680,1600 2680,610 2710,580 2810,580 v1(2840,550) ; v1(3230,2560) U5.2@3230,2730
5V: C2.1 C4.1 C6.1 C7.1 C9.1 C11.1 C18.1 C19.1 L1.2 pad.TP2 Q2.2 R19.1 R23.1 RV1.1 U2.2 U3.2 U7.8 | length 5645.4
  Top Layer w10: C19.1@927.4,1069 R19.1@927.4,1116 ; C19.1@941.4,1055 1170,1055 1195,1055 1215,1075 1215,1354.5
  Top Layer w20: 1170,1060 1170,1055 1170,1030 1200,1000 1260,940 1440,940 1450,950 v1(1820,950) ; pad.TP2@1190,1260 1210,1260 ; 1260,1550 1390,1550 1420,1520 U7.8@1420,1430 ; RV1.1@1359.21,790 v2(1359.21,855) ; v1(1900,950) 2760,950 2790,980 2790,1150 2820,1180 v1(2850,1180) ; 2800,1000 2800,140 2830,110 3360,110 3390,140 Q2.2@3390,230 ; v1(2970,1180) C11.1@3020,1180 ; C11.1@3060,1190 C9.1@3090,1190 ; C7.1@3060,1890 C6.1@3090,1890 ; C9.1@3130,1200 U3.2@3190,1200 ; C6.1@3130,1880 3150,1880 ; 3150,1210 v1(3150,1580) ; v1(3150,1860) 3150,1880 ; U2.2@3190,1880 3150,1880 ; U2.2@3190,1920 3150,1880
  Bottom Layer w20: v2(1359.21,855) 1359.21,899.21 v2(1400,940) ; v1(1820,950) v1(1900,950) ; v1(2850,1180) v1(2970,1180) ; v1(3150,1580) v1(3150,1860)
BLOWER_FG: R12.2 R29.2 U1.19 | length 2889.7
  Top Layer w10: R29.2@610,420 770,420 800,450 v1(800,530) ; v1(800,610) 800,880 830,910 v1(1820,910) ; R12.2@1910,1730 1940,1730 1970,1700 v1(1970,1570) ; R12.2@1920,1740 U1.19@1920,1970 ; v1(1970,990) v1(1970,1410)
  Bottom Layer w10: v1(800,530) v1(800,610) ; v1(1820,910) 1940,910 1970,940 v1(1970,990) ; v1(1970,1410) v1(1970,1570)
BLOWER_FG_IN: J2.4 R29.1 | length 106.6
  Top Layer w10: J2.4@420,460 460,420 R29.1@510,420
BLOWER_PWM: R28.1 U1.18 | length 2572.4
  Top Layer w10: R28.1@670,570 1830,570 1860,600 v1(1860,1410) ; v1(1860,1490) 1860,1970
  Bottom Layer w10: v1(1860,1410) v1(1860,1490)
BLOWER_V12: C25.1 J2.1 Q1.5 Q1.6 Q1.7 Q1.8 | length 509.6
  Top Layer w40: 368.9,630 C25.1
  Top Layer w50: J2.1 300,561 369,630 530,630
BLOWER_VSR: C26.1 J2.3 R28.2 R30.1 | length 230.9
  Top Layer w10: J2.3@420,550 C26.1@470,550 ; C26.1@510,550 R28.2@570,550 ; R28.2@600,530 600,490 620,470 R30.1
BOOT: J3.6 U1.27 | length 1498.1
  Top Layer w10: U1.27 2380,2047.1 2482.9,2150 J3.6
BST3: C20.1 U9.6 | length 70.2
  Top Layer w15: U9.6@837.4,1856.85 C20.1
BST5: C17.1 U8.6 | length 70.2
  Top Layer w15: U8.6@837.4,1236.85 C17.1
BUZZER_CTRL: BZ1.1 U1.20 | length 2235.3
  Top Layer w10: v1(1430,530) 1430,330 1460,300 BZ1.1@1600,300 ; v1(1560,990) 1790,990 1820,1020 v1(1820,1410) ; v1(1820,1490) v1(1820,1700) ; v1(1960,1940) 1960,1970
  Bottom Layer w10: v1(1430,530) 1430,960 1460,990 v1(1560,990) ; v1(1820,1410) v1(1820,1490) ; v1(1820,1700) 1820,1730 1960,1870 v1(1960,1940)
COMP_OUT: R15.1 R17.2 R18.1 U7.1 | length 1424.6
  Top Layer w10: v1(790,920) 790,940 R17.2@810,960 ; R15.1@1250,1180 1270,1200 v1(1290,1200) ; v1(1380,1200) U7.1@1420,1200 ; v1(1680,1180) 1700,1180 R18.1@1720,1200
  Bottom Layer w10: v1(790,920) 790,890 820,860 1190,860 1220,890 1220,1170 1250,1200 v1@1280,1200 ; v1(1290,1200) v1(1380,1200) ; v1@1380,1210 1610,1210 1640,1180 v1(1680,1180)
COMP_REF: R10.2 R11.1 U7.2 | length 231.4
  Top Layer w10: R10.2@1400,1070 1430,1070 1460,1040 1460,1010 R11.1@1480,990 ; R10.2@1420,1090 1470,1140 U7.2@1470,1170
EN: C5.1 J3.5 R9.2 U1.3 | length 3905.4
  Top Layer w10: C5.1@1440,2527.4 R9.2@1440,2562.3 ; R9.2 1465.2,2572.3 1490,2597.1 U1.3@1626,2597.1 ; v1(1530,1670) 1530,2600 ; v1(1970,1790) v1(2050,1870) ; v1(2540,2190) 2540,2210 2570,2240 J3.5@3780,2240
  Bottom Layer w10: v1(1530,1670) 1530,1650 1560,1620 1860,1620 1890,1650 1890,1710 v1(1970,1790) ; v1(2050,1870) 2070,1890 2510,1890 2540,1920 v1(2540,2190)
ENC_A: R7.2 U1.24 U6.1 | length 1193.8
  Top Layer w10: R7.2@2190,1740 v1(2190,1790) 2190,1970 ; v1(2230,1410) 2230,1120 2320,1030 v1(2320,990)
  Bottom Layer w10: v1(2190,1790) 2190,1770 2230,1730 v1(2230,1410) ; 2320,880 v1(2320,990)
ENC_B: R8.2 U1.23 U6.2 | length 1156.6
  Top Layer w10: R8.2@2110,1740 v1(2110,1790) 2110,1970 ; v1(2150,990) v1(2150,1410)
  Bottom Layer w10: v1(2110,1790) 2110,1770 2150,1730 v1(2150,1410) ; U6.2@2150,880 v1(2150,990)
ENC_SW: R14.2 U1.25 U6.4 | length 2201.4
  Top Layer w10: 2240,1970 2240,1750 R14.2@2250,1740 ; R14.2@2290,1730 v1(2320,1730) ; U6.4@2360,260 2390,230 2540,230 2570,260 v1(2570,280)
  Bottom Layer w10: v1(2320,1730) 2540,1730 2570,1700 v1(2570,280)
FB3: C22.2 R21.2 R22.1 U9.4 | length 215.2
  Top Layer w10: U9.4@762.6,1856.85 762.6,1820 777.4,1805.2 R22.1@777.4,1764 ; R22.1@787.4,1750 R21.2@842.6,1750 ; C22.2 R21.2@852.6,1736
FB5: C19.2 R19.2 R20.1 U8.4 | length 215.2
  Top Layer w10: U8.4@762.6,1236.85 762.6,1200 777.4,1185.2 R20.1@777.4,1144 ; R20.1@787.4,1130 R19.2@842.6,1130 ; C19.2 R19.2@852.6,1116
GATE: Q1.4 R13.1 R17.1 | length 413.1
  Top Layer w10: Q1.4@560,890 R13.1@560,930 ; R13.1@560,960 v1(590,960) ; v1(720,960) 750,960 800,1010 870,1010 R17.1@900,980
  Bottom Layer w10: v1(590,960) v1(720,960)
GND: BZ1.2 C1.2 C2.2 C3.2 C4.2 C5.2 C6.2 C7.2 C8.2 C9.2 C10.2 C11.2 C12.2 C13.2 C14.2 C15.2 C16.2 C18.2 C21.2 C23.2 C24.2 C25.2 C26.2 C27.2 D2.2 J1.2 J1.3 J2.2 J3.1 pad.TP4 Q3.2 R2.2 R4.2 R11.2 R16.2 R20.2 R22.2 R26.2 R30.2 U1.1 U1.40 U1.41 U2.3 U3.3 U4.1 U4.4 U5.1 U6.3 U6.5 U7.4 U7.5 U7.6 U8.1 U9.1 | length 1578.4
  Top Layer w15: v1(382.91,2075) C23.2 ; v1(382.91,2150) C10.2 ; pad.TP4 v1(509.5,1330) ; C26.2 v1(544.61,475.2) ; v1(702.6,1075) R20.2 ; v1(702.6,1695) R22.2 ; R30.2 747.4,517.4 v1(760,530) ; R26.2 v1(1132.6,2527.09) ; v1(1440,2400) C5.2 C5.2@1440,2452.6 ; R11.2 v1(1500,1127.09) ; C27.2 1538.5,2721.9 ; v1(1514.49,1466.81) U7.5 ; v1(1538.5,2762) 1538.5,2721.9 ; C3.2 1538.5,2721.9 ; C3.2@1585.2,2721.9 1610,2697.1 U1.1@1626,2697.1 ; v1(2942.6,812.91) R4.2 ; R2.2 v1(2997.21,1562.6) ; v1(2985.39,1812.6) C7.2@3040,1812.5 ; v1(3040,1062.91) C11.2 ; v1(3040,1762.91) C7.2@3040,1812.5 ; C7.2 C7.2@3040,1812.5 ; v1(3055.39,1625.2) C8.2 ; v1(3110,875.51) C12.2 ; v1(3110,1062.91) C9.2 ; C6.2 C7.2@3040,1812.5 ; v1(3110.94,162.6) Q3.2 ; v1(3137.91,300) C24.2
  Top Layer w20: C2.2 v1(1375,1417.5) ; C18.2 v1(1375,1492.5) ; C21.2 v1(1375,2037.5) ; C1.2 v1(1375,2112.5)
  other v1: 2610,280 1390,530 760,610 1820,870 1900,990 2010,990 2110,990 2280,990 720,1000 1560,1030 1680,1140 2850,1140 2970,1140 1380,1160 1290,1240 1300,1360 1780,1410 1900,1410 2010,1410 2110,1410 2190,1410 880,1480 1780,1490 1900,1490 880,1555 2010,1570 3110,1580 2010,1660 2320,1770 2070,1790 2150,1790 2540,1790 1770,1940 2000,1940 880,2100 880,2175 2500,2190 2540,2540 3190,2560 2670,2630 2620,2740
  other v3: 1913.4,2365.6 1968.5,2365.6 1913.4,2420.7 1968.5,2420.7
I2C_SCL: R5.2 U1.39 U4.3 U5.3 | length 4210.3
  Top Layer w10: U1.39 2400,2647.1 2452.9,2700 v1(2620,2700) 2760,2700 ; R5.2 2760,2700 ; U5.3 3350,2720 3330,2700 2760,2700
  Bottom Layer w10: v1(2620,2700) 2620,500 2640,480 3430,480 3450,460 U4.3
I2C_SDA: R6.2 U1.38 U4.5 U5.4 | length 4446.2
  Top Layer w10: U1.38 v1(2650,2597.1) 2860,2597.1 ; R6.2 2860,2597.1 ; U5.4 3450,2627.1 3420,2597.1 2860,2597.1
  Bottom Layer w10: v1(2650,2597.1) 2650,530 2670,510 3630,510 3650,490 U4.5
PRESS_PRI_ADC: R1.2 R2.1 U1.4 | length 2417.4
  Top Layer w10: v1(1600,2530) 1630,2560 1655.5,2560 U1.4@1660,2560 ; v1(1640,1770) 1750,1660 v1(1780,1660) ; v1(2540,1830) 2900,1830 2930,1800 R1.2@2930,1720 ; R2.1@2940,1650 R1.2@2940,1680
  Bottom Layer w10: v1(1600,2530) 1580,2510 1580,1830 v1(1640,1770) ; v1(1780,1660) 1830,1660 1860,1690 1860,1730 1960,1830 v1(2540,1830)
PRESS_PRI_RAW: C8.1 R1.1 U2.4 | length 110
  Top Layer w10: R1.1@3030,1700 C8.1@3090,1700 ; C8.1@3130,1700 3180,1700
PRESS_RED_ADC: R3.2 R4.1 R18.2 U1.5 U7.3 | length 3506.7
  Top Layer w10: U7.3@1520,1170 1550,1140 1610,1140 1640,1170 1640,1250 1670,1280 R18.2@1700,1280 ; v1(1570,1470) 1570,2460 1600,2490 U1.5@1630,2490 ; v1(1620,1400) R18.2@1720,1300 ; v1(1900,1530) 2900,1530 2930,1500 R3.2@2930,1020 ; R4.1@2940,950 R3.2@2940,980
  Bottom Layer w10: v1(1570,1470) 1570,1450 v1(1620,1400) ; v1@1580,1470 1580,1500 1610,1530 v1(1900,1530)
PRESS_RED_RAW: C12.1 R3.1 U3.4 | length 120
  Top Layer w10: R3.1@3030,1000 C12.1@3090,1000 ; C12.1@3130,1000 U3.4@3190,1000
REF_TOP: R10.1 RV1.2 RV1.3 | length 683.3
  Top Layer w10: RV1.3@1260.79,790 v2(1260.79,855.79) 1240,876.57 1220.79,876.57 1200,855.79 1200,650 1210,640 RV1.2@1290,640 ; v2(1340,1002.6) R10.1
  Bottom Layer w10: v2(1260.79,855.79) 1340,935 v2(1340,1002.6)
RPP_G: Q4.4 R26.1 R27.1 | length 80
  Top Layer w10: Q4.4@1080,2330 R27.1@1120,2330 ; R27.1@1130,2350 R26.1@1130,2390
SAFETY_TRIP: R15.2 R16.1 U1.17 | length 1355.6
  Top Layer w10: R16.1@1250,1080 1270,1100 1300,1100 1330,1130 R15.2@1330,1160 ; R15.2@1340,1180 v1(1340,1360) ; v1(1810,1940) 1810,1970
  Bottom Layer w10: v1(1340,1360) 1340,1700 1370,1730 1780,1730 1810,1760 v1(1810,1940)
SFM_5V: C24.1 Q2.3 U4.2 | length 100
  Top Layer w20: C24.1@3280,320 Q2.3@3340,320 ; 3350,340 U4.2@3350,380
SFM_EN: Q3.1 R24.2 U1.9 | length 3456
  Top Layer w10: U1.9@1660,2300 1655.5,2300 1630,2300 1600,2270 1600,1480 1630,1450 2860,1450 2890,1420 2890,450 R24.2@3080,260 ; R24.2@3110,240 Q3.1@3150,240
SFM_G: Q2.1 Q3.3 R23.2 | length 94.1
  Top Layer w10: 3260,190 3290,190 R23.2@3300,180 ; R23.2@3320,180 Q2.1@3320,230
SW3: C20.2 L2.1 U9.2 | length 484.3
  Top Layer w25: C20.2 L2.1
  Bottom Layer w24: v1(800,2010) v1(800,2045)
  Bottom Layer w30: 800,2027.5 865,2027.5 v1@982.5,1910
  other v1: 982.4,1910
SW5: C17.2 L1.1 U8.2 | length 484.3
  Top Layer w25: C17.2 L1.1
  Bottom Layer w24: v1(800,1390) v1(800,1425)
  Bottom Layer w30: 800,1407.5 865,1407.5 v1@982.5,1290
  other v1: 982.4,1290
UART_RX: J3.4 U1.36 | length 1516.4
  Top Layer w10: U1.36 2370,2497.1 2517.1,2350 J3.4
UART_TX: J3.3 U1.37 | length 1495.7
  Top Layer w10: U1.37 2400,2547.1 2497.1,2450 J3.3
VIN12V: C10.1 C13.1 C14.1 C15.1 C16.1 C23.1 D2.1 pad.TP1 Q1.1 Q1.2 Q1.3 Q4.1 Q4.2 Q4.3 R13.2 R27.2 U8.3 U9.3 | length 2082.4
  Top Layer w20: R13.2 630,1022.4 ; 1037,2270 1187.4,2270 1207.4,2290 R27.2
  Top Layer w25: C23.1 630,2075 ; C10.1 630,2150
  Top Layer w50: 630,1560 700,1560 ; 665,930 665,965 630,1000 630,2200 655,2225 700,2225 ; 1160,2270 pad.TP1@1250,2270
VIN_FUSED: F1.2 Q4.5 Q4.6 Q4.7 Q4.8
VIN_RAW: F1.1 J1.1 | length 415.6
  Top Layer w60: J1.1 689.4,2480 799.6,2590.2 F1.1
pads on no net: U1.6 U1.7 U1.8 U1.10 U1.11 U1.12 U1.13 U1.14 U1.15 U1.16 U1.21 U1.22 U1.26 U1.28 U1.29 U1.30 U1.31 U1.32 U1.33 U1.34 U1.35 U2.1 U2.5 U2.6 U2.7 U2.8 U3.1 U3.5 U3.6 U3.7 U3.8 U4.6 U6.MP U7.7 U8.5 U9.5

## Polygon pours and split planes (outlines as drawn)
GND on Bottom Layer "Bottom Layer-GND" (solid, remove dead copper, pour order 0): 0,0 4000,0 4000,3000 0,3000
GND on Top Layer "Top Layer-GND" (solid, remove dead copper, pour order 1): 0,0 4000,0 4000,3000 0,3000

## Keep-outs
Keep-Out Layer:
  lines w30: 0,2280 0,0 4000,0 4000,3000 2380,3000 ; 0,2680 0,3000 1620,3000

## Other copper
Top Layer:
  region net BLOWER_V12: 515,684 515,598 727,598 727,684
  region net VIN12V: 603,930 603,836 727,836 727,930
  region net VIN12V: 700,2240 700,2210 775,2210 775,2240
  region net VIN12V: 700,2254 700,2232 1037,2232 1037,2254
  region net VIN12V: 813,2364 813,2254 1037,2254 1037,2364
  region net VIN_FUSED: 963,2600 963,2700 1038,2700 1038,2600 1088,2600 1088,2516 912,2516 912,2600
  region net GND: 1302.9,1393 1341.9,1393 1341.9,1517 1302.9,1517
  region net 5V: 1132,1354.5 1267,1354.5 1267,1555.5 1132,1555.5
  region net SW5: 788,1321.5 812,1321.5 812,1455 788,1455
  region net GND: 825,1321.5 900,1321.5 900,1600 825,1600
  region net VIN12V: 700,1321.5 775,1321.5 775,1600 700,1600
  region net GND: 1302.9,2013 1341.9,2013 1341.9,2137 1302.9,2137
  region net 3V3: 1132,1974.5 1267,1974.5 1267,2175.5 1132,2175.5
  region net SW3: 788,1941.5 812,1941.5 812,2075 788,2075
  region net GND: 825,1941.5 900,1941.5 900,2220 825,2220
  region net VIN12V: 700,1941.5 775,1941.5 775,2220 700,2220

## Silkscreen, mask and mechanical layers (free items; w line width, h text height)
Top Overlay:
  lines w6: 414.9,870 454.9,870 ; 434.9,850 434.9,890 ; 1535.58,280 1575.58,280 ; 1555.58,260 1555.58,300
  lines w10: 845,2290 845,2370
  lines w14: 249.7,568.13 250.7,568.13 ; 744.57,877.24 745.57,877.24 ; 866.97,1354.09 867.97,1354.09 ; 866.97,1974.09 867.97,1974.09 ; 894.43,2344.65 895.43,2344.65 ; 1394.43,1204.65 1395.43,1204.65 ; 1675.51,2732.59 1676.51,2732.59 ; 3100.26,2758.68 3101.26,2758.68 ; 3199.7,381.87 3200.7,381.87 ; 3238.26,1349.24 3239.26,1349.24 ; 3238.26,2049.24 3239.26,2049.24 ; 3808.18,2699.24 3809.18,2699.24
  text "12V IN" at 316.87,2624.01 h40
  text "GND" at 3640.18,2624.01 h40
  text "3V3" at 3580.37,2524.01 h40
  text "TX" at 3620.35,2424.01 h40
  text "UART" at 3928.39,2418.69 h40 r90
  text "RX" at 3620.35,2324.01 h40
  text "12V" at 1315.12,2231.51 h40
  text "EN" at 3620.35,2224.01 h40
  text "3V3" at 1475,2164.01 h40
  text "IO0" at 3587.03,2124.01 h40
  text "SiPAP Rev C v3 2026-11" at 1933.67,1342.61 h50
  text "GND" at 525,1304.01 h40
  text "5V" at 1130.18,1164.01 h40
  text "BLOWER" at 230.2,314.01 h40
Mechanical 13:
  lines w3.94: 0,2302.83 0,2657.17 566.93,2657.17 566.93,2302.83 0,2302.83
Mechanical 15:
  lines w1.97: 0,2245.75 0,2667 588.58,2667 588.58,2245.75 0,2245.75